# Altium PCB sdc-le-05.PcbDoc
Units mm, origin at the board's own origin, x right, y up, seen from the top; angles counter-clockwise.
Board outline 33.9 x 30.8 mm, 2 copper layers (Top Layer, Bottom Layer), stack 1.58 mm thick; 1 components, 0 nets, 18 pads, 0 vias.
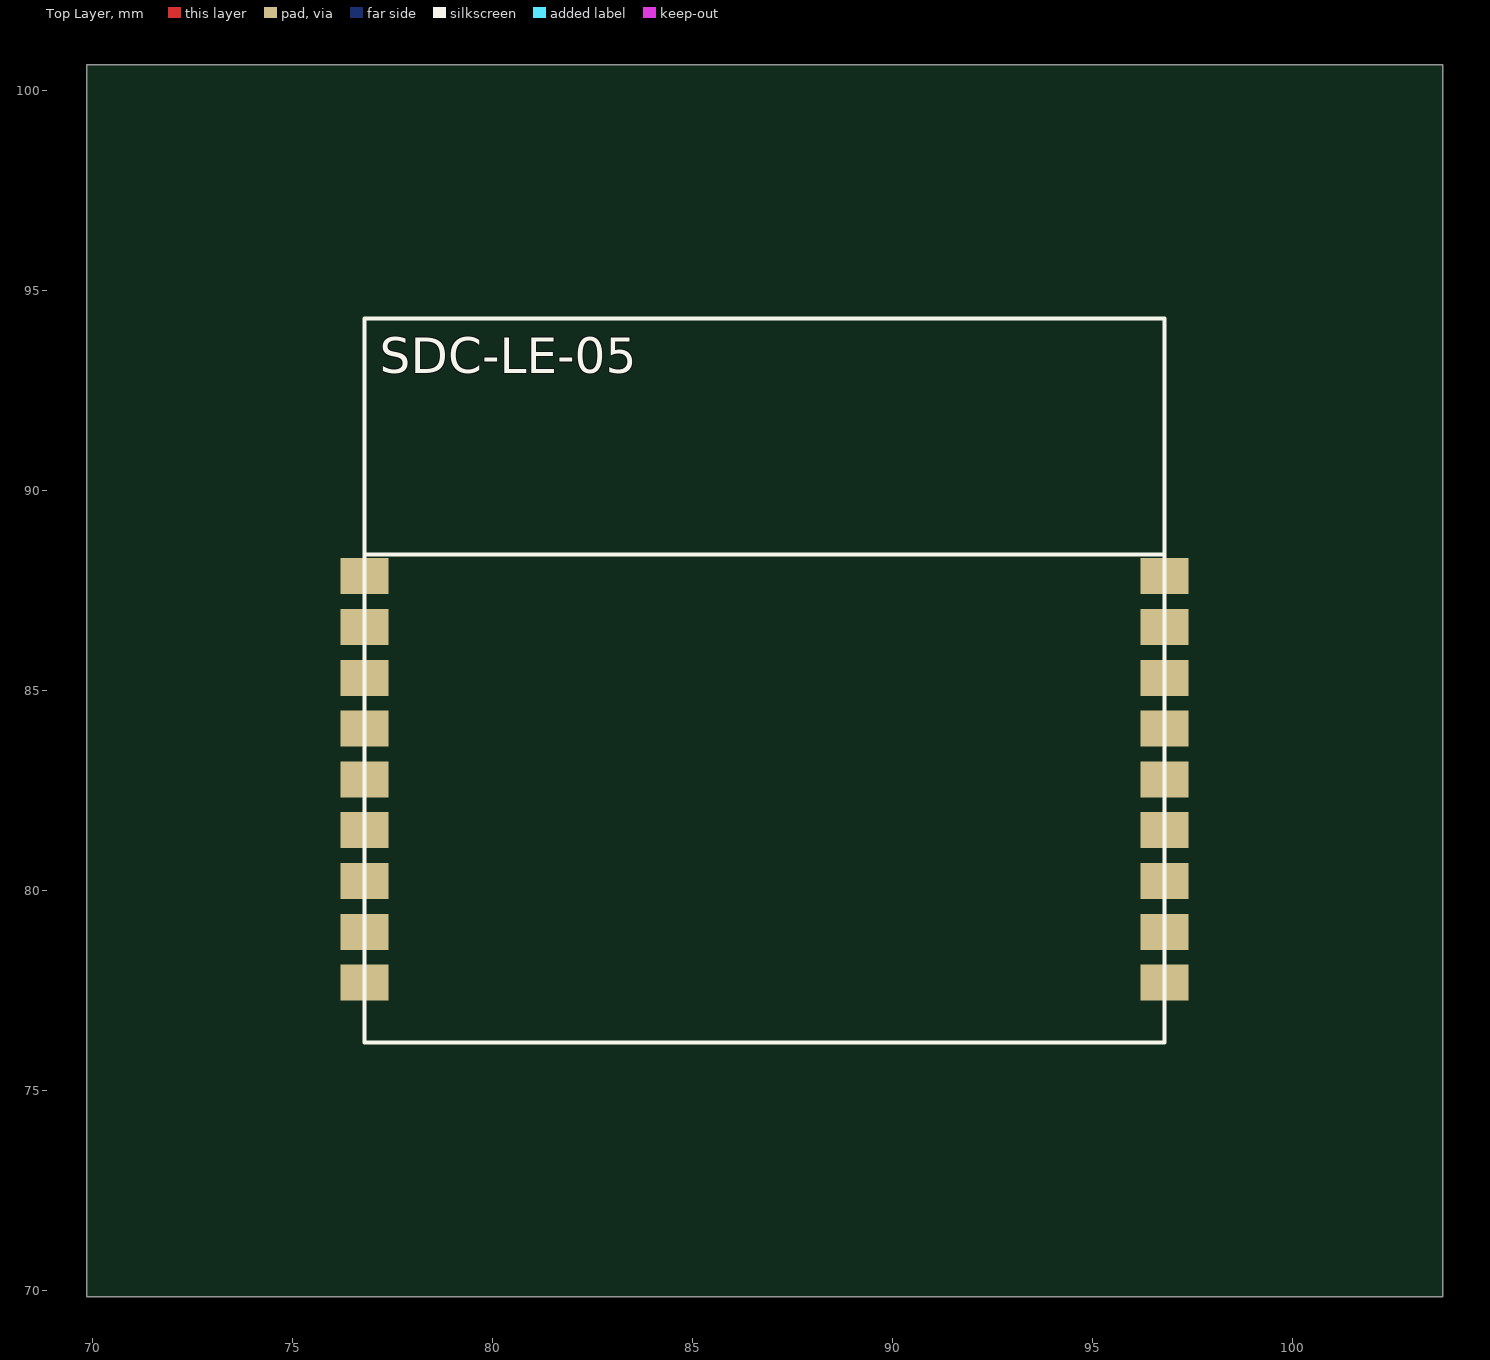
[diagram p0: Top Layer view]
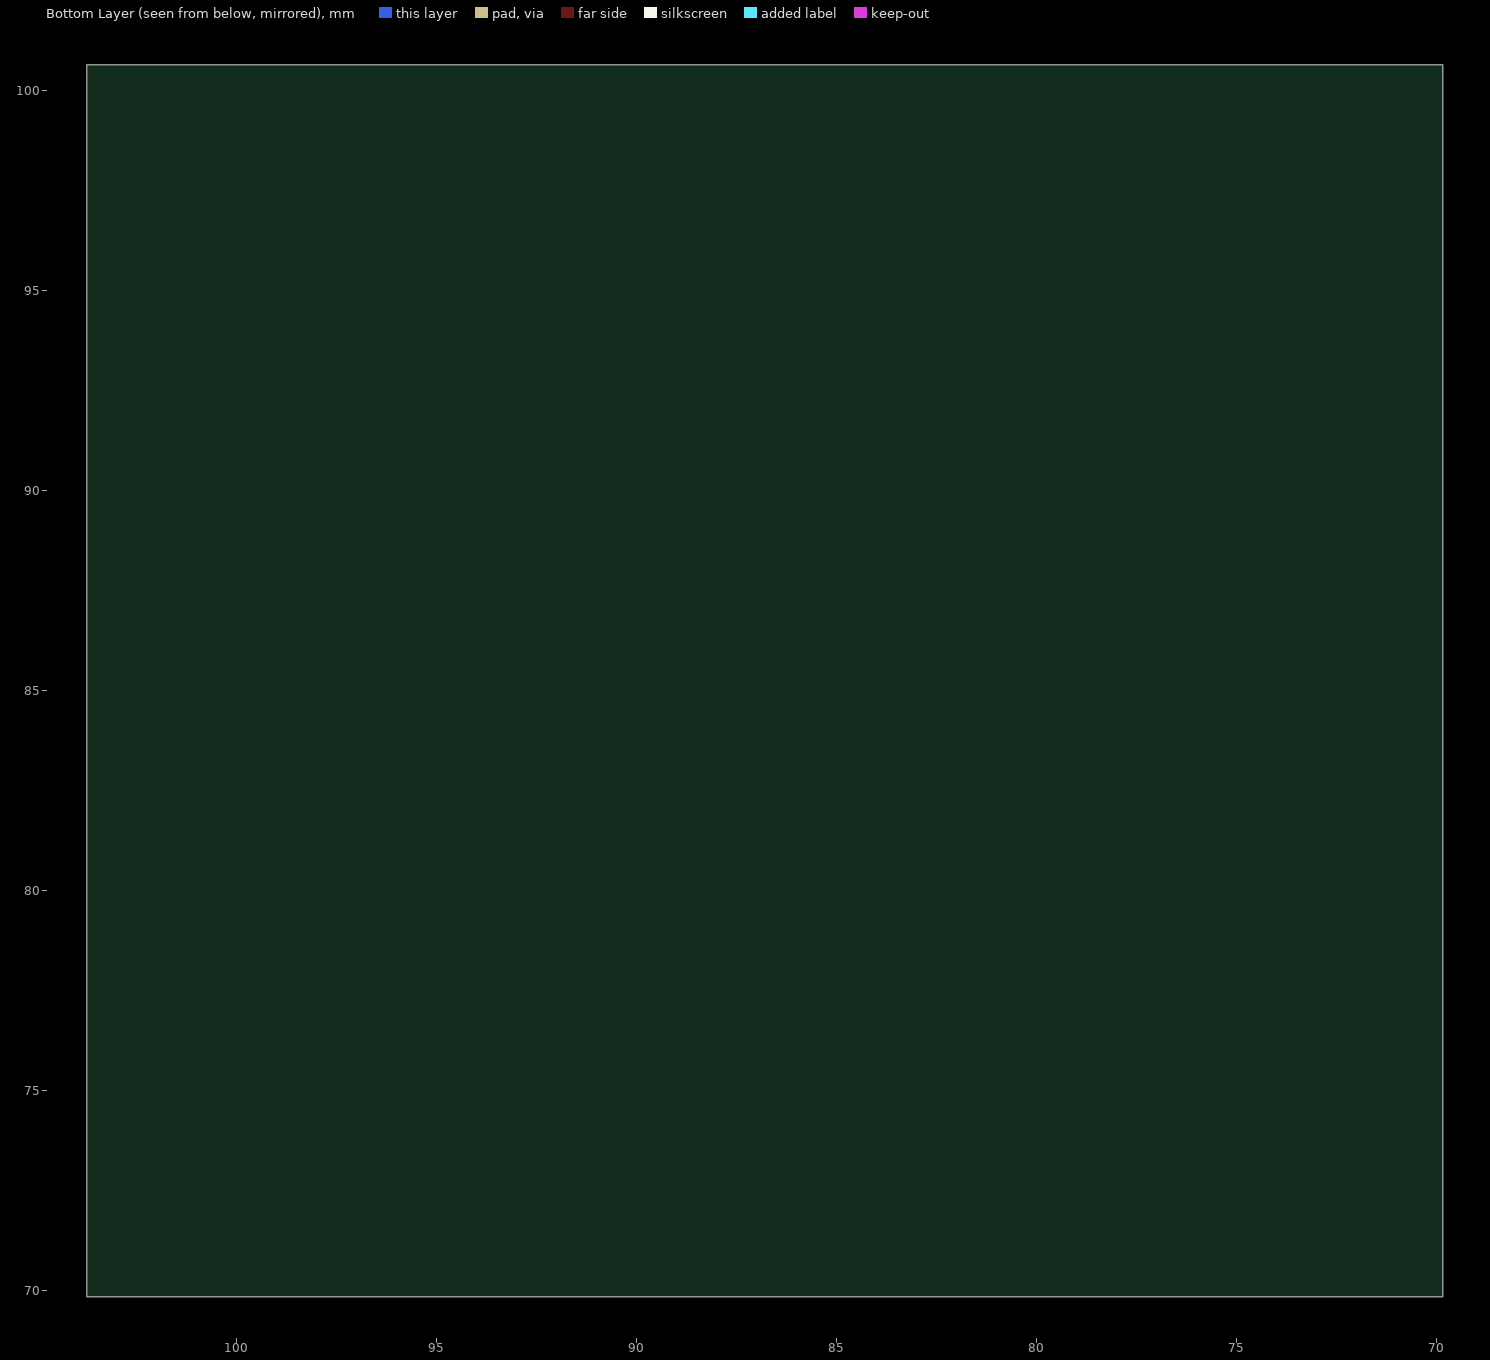
[diagram p1: Bottom Layer view, seen from below]

## Layer stack, top to bottom
Top Solder Mask Layer: solder mask 0.0102, Dk 3.3
Top Layer: signal copper 0.0356
Dielectric1: surface 1.5088, FR4, Dk 4.5
Bottom Layer: signal copper 0.0356
Bottom Solder Mask Layer: solder mask 0.0102, Dk 3.3

## Board outline
103.749,69.85 69.85,69.85 69.85,100.65 103.749,100.65

## Components (designator, comment, footprint, x,y, rotation, side; value= is the part's Value field where it differs from the comment)
? "" SDC-LE-05(AB56505B模组) 76.672,87.861 r0 top

## Footprints (in the part's own frame and the unit in brackets; to place one, negate y for a bottom-side part, rotate by r counter-clockwise, add the part's x,y. Pads: shape width x height; smd on the part's side, far side on the other; paste and mask are expansions set on the pad)
SDC-LE-05(AB56505B模组) [mil]
  rect 47.2x35.4 smd: 1(5,0) 2(5,-50) 3(5,-100) 4(5,-150) 5(5,-200) 6(5,-250) 7(5,-300) 8(5,-350) 9(5,-400) 10(792.4,-400) 11(792.4,-350) 12(792.4,-300) 13(792.4,-250) 14(792.4,-200) 15(792.4,-150) 16(792.4,-100) 17(792.4,-50) 18(792.4,0)
  silkscreen extent 5,-459 792,254

## Nets (pads, with @x,y where several pads share a name; then routed paths per layer and width w, separated by ;. In a path a pad name is that pad's centre, name@x,y a point inside that pad or via, vN(x,y) a via of type N, cw(c..) or ccw(c..) an arc to the next point about the centre after c; other vN are vias at no path point)
pads on no net: ?.1 ?.2 ?.3 ?.4 ?.5 ?.6 ?.7 ?.8 ?.9 ?.10 ?.11 ?.12 ?.13 ?.14 ?.15 ?.16 ?.17 ?.18

## Text inside footprints (layer, text, board x,y; h text height)
?: Top Silkscreen Layer "SDC-LE-05" at 77.18,92.941 h0.89